# Altium PCB machdaucam96chan.PcbDoc
Units mm, origin at the board's own origin, x right, y up, seen from the top; angles counter-clockwise.
Board outline 94 x 30 mm, 2 copper layers (Top Layer, Bottom Layer); 103 components, 97 nets, 198 pads, 0 vias.
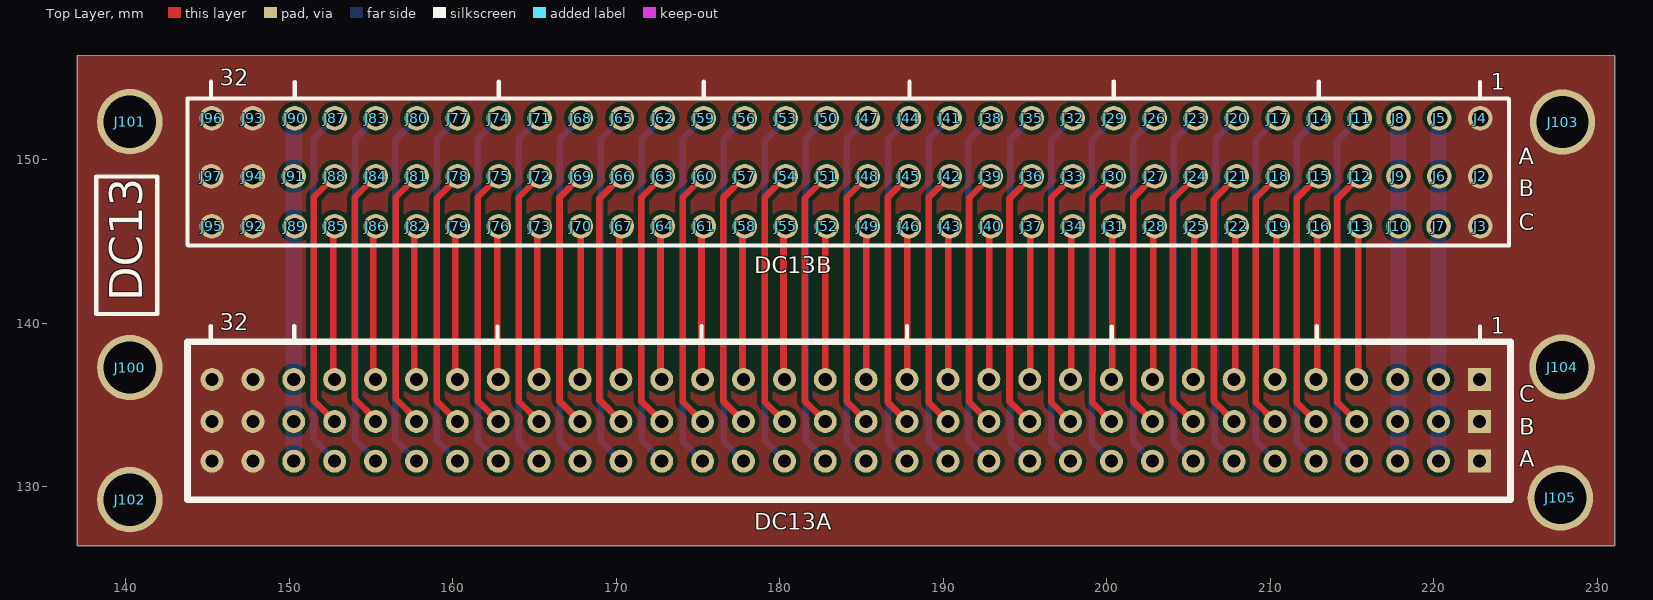
[diagram p0: Top Layer view]
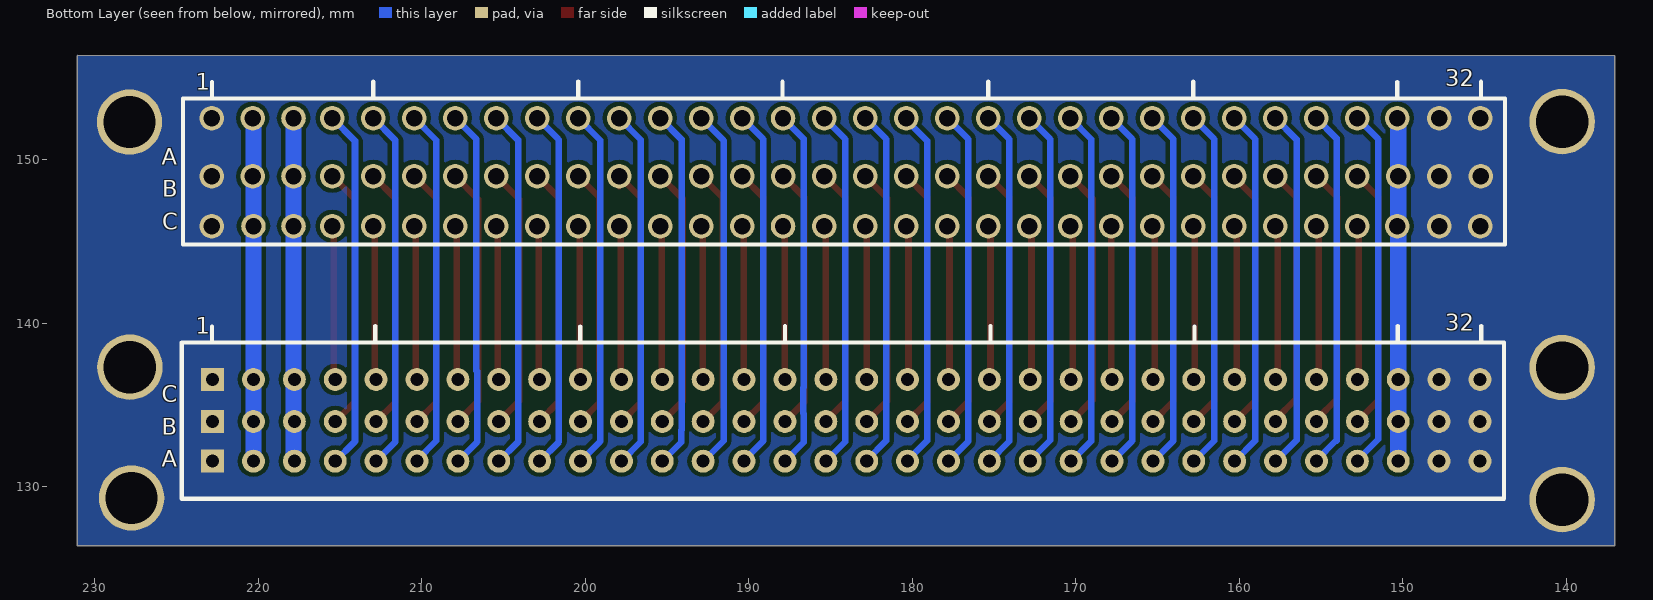
[diagram p1: Bottom Layer view, seen from below]

## Layer stack, top to bottom
Top Solder: solder mask 0.0102, Solder Resist, Dk 3.5
Top Layer: signal copper 0.0356
Dielectric1: dielectric 0.32, FR-4, Dk 4.8
Bottom Layer: signal copper 0.0356
Bottom Solder: solder mask 0.0102, Solder Resist, Dk 3.5

## Board outline
137.05,156.35 137.05,126.375 231.05,126.375 231.05,156.35 231.025,156.375

## Design rules (kind name [scope] priority, off if disabled: settings)
Clearance [All] p1: gap=0.1 ignorepadtopadclearanceinfootprint=FALSE
HoleSize [All] p1: absolutevalues=TRUE maxlimit=5 minlimit=0.025 maxpercent=80.000 minpercent=20.000
MinimumSolderMaskSliver [All] p1: minsoldermaskwidth=0.1
PolygonConnect [All] p1: connectstyle=Direct reliefconductorwidth=0.254 reliefentries=4 polygonreliefangle="90 Angle" airgapwidth=0.254
RoutingVias [All] p1: holewidth=1 width=1.5 viastyle="Through Hole" minholewidth=1 minwidth=1.5 maxholewidth=1 maxwidth=1.5
ShortCircuit [All] p1: allowed=TRUE
SilkToSilkClearance [All] p1: silktosilkclearance=0.1
SilkToSolderMaskClearance SilkscreenOverComponentPads [IsPad] p1: minsilkscreentomaskgap=0.1 clearancetoexposedcopper=TRUE
SolderMaskExpansion [All] p1: expansion=0.102
Width [All] p1: maxlimit=1 minlimit=0.254 preferedwidth=0.5
25 further rules are at their usual default settings.

## Components (designator, comment, footprint, x,y, rotation, side; value= is the part's Value field where it differs from the comment)
DC13 "GIAC 32x3 (A,B,C)" daucam96 222.783,135.56 r180 top (schematic designator J1)
J2 "header1" CON1#1 222.833,148.981 r0 top
J3 "header1" CON1#1 222.833,145.933 r0 top
J4 "header1" CON1#1 222.833,152.537 r0 top
J5 "header1" CON1#1 220.333,152.537 r0 top
J6 "header1" CON1#1 220.333,148.981 r0 top
J7 "header1" CON1#1 220.283,145.933 r0 top
J8 "header1" CON1#1 217.833,152.537 r0 top
J9 "header1" CON1#1 217.833,148.981 r0 top
J10 "header1" CON1#1 217.833,145.933 r0 top
J11 "header1" CON1#1 215.466,152.537 r0 top
J12 "header1" CON1#1 215.466,148.981 r0 top
J13 "header1" CON1#1 215.466,145.933 r0 top
J14 "header1" CON1#1 212.958,152.537 r0 top
J15 "header1" CON1#1 212.958,148.981 r0 top
J16 "header1" CON1#1 212.958,145.933 r0 top
J17 "header1" CON1#1 210.451,152.537 r0 top
J18 "header1" CON1#1 210.451,148.981 r0 top
J19 "header1" CON1#1 210.451,145.933 r0 top
J20 "header1" CON1#1 207.944,152.537 r0 top
J21 "header1" CON1#1 207.944,148.981 r0 top
J22 "header1" CON1#1 207.944,145.933 r0 top
J23 "header1" CON1#1 205.437,152.537 r0 top
J24 "header1" CON1#1 205.437,148.981 r0 top
J25 "header1" CON1#1 205.437,145.933 r0 top
J26 "header1" CON1#1 202.93,152.537 r0 top
J27 "header1" CON1#1 202.93,148.981 r0 top
J28 "header1" CON1#1 202.93,145.933 r0 top
J29 "header1" CON1#1 200.422,152.537 r0 top
J30 "header1" CON1#1 200.422,148.981 r0 top
J31 "header1" CON1#1 200.422,145.933 r0 top
J32 "header1" CON1#1 197.915,152.537 r0 top
J33 "header1" CON1#1 197.915,148.981 r0 top
J34 "header1" CON1#1 197.915,145.933 r0 top
J35 "header1" CON1#1 195.408,152.537 r0 top
J36 "header1" CON1#1 195.408,148.981 r0 top
J37 "header1" CON1#1 195.408,145.933 r0 top
J38 "header1" CON1#1 192.901,152.537 r0 top
J39 "header1" CON1#1 192.901,148.981 r0 top
J40 "header1" CON1#1 192.901,145.933 r0 top
J41 "header1" CON1#1 190.393,152.537 r0 top
J42 "header1" CON1#1 190.393,148.981 r0 top
J43 "header1" CON1#1 190.393,145.933 r0 top
J44 "header1" CON1#1 187.9,152.532 r0 top
J45 "header1" CON1#1 187.886,148.981 r0 top
J46 "header1" CON1#1 187.9,145.928 r0 top
J47 "header1" CON1#1 185.379,152.537 r0 top
J48 "header1" CON1#1 185.379,148.981 r0 top
J49 "header1" CON1#1 185.379,145.933 r0 top
J50 "header1" CON1#1 182.872,152.537 r0 top
J51 "header1" CON1#1 182.872,148.981 r0 top
J52 "header1" CON1#1 182.872,145.933 r0 top
J53 "header1" CON1#1 180.365,152.537 r0 top
J54 "header1" CON1#1 180.365,148.981 r0 top
J55 "header1" CON1#1 180.365,145.933 r0 top
J56 "header1" CON1#1 177.857,152.537 r0 top
J57 "header1" CON1#1 177.857,148.981 r0 top
J58 "header1" CON1#1 177.857,145.933 r0 top
J59 "header1" CON1#1 175.35,152.537 r0 top
J60 "header1" CON1#1 175.35,148.981 r0 top
J61 "header1" CON1#1 175.35,145.933 r0 top
J62 "header1" CON1#1 172.843,152.537 r0 top
J63 "header1" CON1#1 172.843,148.981 r0 top
J64 "header1" CON1#1 172.843,145.933 r0 top
J65 "header1" CON1#1 170.336,152.537 r0 top
J66 "header1" CON1#1 170.336,148.981 r0 top
J67 "header1" CON1#1 170.336,145.933 r0 top
J68 "header1" CON1#1 167.828,152.537 r0 top
J69 "header1" CON1#1 167.828,148.981 r0 top
J70 "header1" CON1#1 167.828,145.933 r0 top
J71 "header1" CON1#1 165.321,152.537 r0 top
J72 "header1" CON1#1 165.321,148.981 r0 top
J73 "header1" CON1#1 165.321,145.933 r0 top
J74 "header1" CON1#1 162.814,152.537 r0 top
J75 "header1" CON1#1 162.814,148.981 r0 top
J76 "header1" CON1#1 162.814,145.933 r0 top
J77 "header1" CON1#1 160.307,152.537 r0 top
J78 "header1" CON1#1 160.307,148.981 r0 top
J79 "header1" CON1#1 160.307,145.933 r0 top
J80 "header1" CON1#1 157.8,152.537 r0 top
J81 "header1" CON1#1 157.8,148.981 r0 top
J82 "header1" CON1#1 157.8,145.933 r0 top
J83 "header1" CON1#1 155.292,152.537 r0 top
J84 "header1" CON1#1 155.292,148.981 r0 top
J85 "header1" CON1#1 152.785,145.933 r0 top
J86 "header1" CON1#1 155.292,145.933 r0 top
J87 "header1" CON1#1 152.785,152.537 r0 top
J88 "header1" CON1#1 152.785,148.981 r0 top
J89 "header1" CON1#1 150.343,145.933 r0 top
J90 "header1" CON1#1 150.343,152.537 r0 top
J91 "header1" CON1#1 150.278,148.981 r0 top
J92 "header1" CON1#1 147.771,145.933 r0 top
J93 "header1" CON1#1 147.771,152.537 r0 top
J94 "header1" CON1#1 147.771,148.981 r0 top
J95 "header1" CON1#1 145.263,145.933 r0 top
J96 "header1" CON1#1 145.263,152.537 r0 top
J97 "header1" CON1#1 145.228,148.976 r0 top
J100 "header1" CON1#2 140.259,137.287 r0 top
J101 "header1" CON1#2 140.259,152.324 r0 top
J102 "header1" CON1#2 140.259,129.21 r0 top
J103 "header1" CON1#2 227.863,152.298 r0 top
J104 "header1" CON1#2 227.838,137.312 r0 top
J105 "header1" CON1#2 227.736,129.311 r0 top

## Footprints (in the part's own frame and the unit in brackets; to place one, negate y for a bottom-side part, rotate by r counter-clockwise, add the part's x,y. Pads: shape width x height; smd on the part's side, far side on the other; paste and mask are expansions set on the pad)
CON1#1 [mm]
  round 1.5 hole 1: 1(0,0)
CON1#2 [mm]
  round 4 hole 3.2: 1(0,0)
daucam96 [mm]
  rect 1.4x1.4 hole 0.8: 1(0,4) 33(0,1.575) 65(0,-1)
  round 1.4 hole 0.8: 2(2.5,4) 3(5,4) 4(7.5,4) 5(10,4) 6(12.5,4) 7(15,4) 8(17.5,4) 9(20,4) 10(22.5,4) 11(25,4) 12(27.5,4) 13(30,4) 14(32.5,4) 15(35,4) 16(37.5,4) 17(40,4) 18(42.5,4) 19(45,4) 20(47.5,4) 21(50,4) 22(52.5,4) 23(55,4) 24(57.5,4) 25(60,4) 26(62.5,4) 27(65,4) 28(67.5,4) 29(70,4) 30(72.5,4) 31(75,4) 32(77.5,4) 34(2.5,1.575) 35(5,1.575) 36(7.5,1.575) 37(10,1.575) 38(12.5,1.575) 39(15,1.575) 40(17.5,1.575) 41(20,1.575) 42(22.5,1.575) 43(25,1.575) 44(27.5,1.575) 45(30,1.575) 46(32.5,1.575) 47(35,1.575) 48(37.5,1.575) 49(40,1.575) 50(42.5,1.575) 51(45,1.575) 52(47.5,1.575) 53(50,1.575) 54(52.5,1.575) 55(55,1.575) 56(57.5,1.575) 57(60,1.575) 58(62.5,1.575) 59(65,1.575) 60(67.5,1.575) 61(70,1.575) 62(72.5,1.575) 63(75,1.575) 64(77.5,1.575) 66(2.5,-1) 67(5,-1) 68(7.5,-1) 69(10,-1) 70(12.5,-1) 71(15,-1) 72(17.5,-1) 73(20,-1) 74(22.5,-1) 75(25,-1) 76(27.5,-1) 77(30,-1) 78(32.5,-1) 79(35,-1) 80(37.5,-1) 81(40,-1) 82(42.5,-1) 83(45,-1) 84(47.5,-1) 85(50,-1) 86(52.5,-1) 87(55,-1) 88(57.5,-1) 89(60,-1) 90(62.5,-1) 91(65,-1) 92(67.5,-1) 93(70,-1) 94(72.5,-1) 95(75,-1) 96(77.5,-1)
  silkscreen extent -1.9,-3.3 79,6.35

## Nets (pads, with @x,y where several pads share a name; then routed paths per layer and width w, separated by ;. In a path a pad name is that pad's centre, name@x,y a point inside that pad or via, vN(x,y) a via of type N, cw(c..) or ccw(c..) an arc to the next point about the centre after c; other vN are vias at no path point)
GND: DC13.1 DC13.31 DC13.32 DC13.33 DC13.63 DC13.64 DC13.65 DC13.95 DC13.96 J2.1 J3.1 J4.1 J92.1 J93.1 J94.1 J95.1 J96.1 J97.1 J100.1 J101.1 J102.1 J103.1 J104.1 J105.1
NetJ1_1: 
NetJ1_2: DC13.2 DC13.34 DC13.66 J5.1 J6.1 J7.1 | length 21
  Bottom Layer w1: DC13.2 DC13.34 DC13.66 J7.1 220.283,152.487 J5.1
NetJ1_3: DC13.3 DC13.35 DC13.67 J8.1 J9.1 J10.1 | length 21
  Bottom Layer w1: DC13.3 217.833,131.61 J10.1 J9.1 J8.1
NetJ1_4: DC13.4 J11.1 | length 22.1
  Bottom Layer w0.4: DC13.4 214.074,132.77 214.074,151.145 J11.1
NetJ1_5: DC13.5 J14.1 | length 22
  Bottom Layer w0.4: DC13.5 211.599,132.745 211.599,151.177 J14.1
NetJ1_6: DC13.6 J17.1 | length 22.2
  Bottom Layer w0.4: DC13.6 210.283,131.623 209.099,132.808 209.099,151.184 J17.1 J17.1@210.3,152.537
NetJ1_7: DC13.7 J20.1 | length 22
  Bottom Layer w0.4: DC13.7 206.602,132.741 206.602,137.049 206.649,137.095 206.649,151.241 J20.1
NetJ1_8: DC13.8 J23.1 | length 22.2
  Bottom Layer w0.4: J23.1@205.275,152.537 J23.1 204.102,151.203 204.102,132.741 DC13.8
NetJ1_9: DC13.9 J26.1 | length 22
  Bottom Layer w0.4: 201.602,151.21 201.602,137.049 201.602,132.741 DC13.9 ; 201.647,151.254 J26.1
NetJ1_10: DC13.10 J29.1 | length 22
  Bottom Layer w0.4: DC13.10 199.074,132.77 199.074,151.188 J29.1
NetJ1_11: DC13.11 J32.1 | length 22
  Bottom Layer w0.4: DC13.11 196.599,132.745 196.599,151.22 J32.1
NetJ1_12: DC13.12 J35.1 | length 22
  Bottom Layer w0.4: DC13.12 194.125,132.718 194.125,133.45 194.102,133.473 194.102,151.231 J35.1
NetJ1_13: DC13.13 J38.1 | length 22.1
  Bottom Layer w0.4: DC13.13 191.532,132.812 191.532,151.168 J38.1
NetJ1_14: DC13.14 J41.1 | length 22
  Bottom Layer w0.4: DC13.14 190.283,131.623 189.102,132.804 189.102,137.049 189.111,137.057 189.111,151.254 J41.1
NetJ1_15: DC13.15 J44.1 | length 22.1
  Bottom Layer w0.4: J44.1@187.772,152.532 J44.1 186.629,151.261 186.629,136.082 186.665,136.047 186.665,134.498 186.629,134.463 186.629,132.714 DC13.15
NetJ1_16: DC13.16 J47.1 | length 22.5
  Bottom Layer w0.4: DC13.16 184.096,132.747 184.096,151.254 J47.1 J47.1@185.379,152.082
NetJ1_17: DC13.17 J50.1 | length 22
  Bottom Layer w0.4: DC13.17 182.783,131.623 181.589,132.817 181.589,151.254 J50.1
NetJ1_18: DC13.18 J53.1 | length 22.4
  Bottom Layer w0.4: DC13.18 180.283,131.623 179.082,132.824 179.082,151.144 180.365,152.426 J53.1 J53.1@180.365,152.094
NetJ1_19: DC13.19 J56.1 | length 22
  Bottom Layer w0.4: DC13.19 176.575,132.769 176.575,151.254 J56.1
NetJ1_20: DC13.20 J59.1 | length 22.5
  Bottom Layer w0.4: DC13.20 174.068,132.776 174.068,151.254 J59.1 J59.1@175.35,152.032
NetJ1_21: DC13.21 J62.1 | length 22
  Bottom Layer w0.4: DC13.21 172.783,131.623 171.56,132.846 171.56,151.254 J62.1
NetJ1_22: DC13.22 J65.1 | length 22
  Bottom Layer w0.4: DC13.22 169.049,132.795 169.049,151.25 J65.1
NetJ1_23: DC13.23 J68.1 | length 22
  Bottom Layer w0.4: DC13.23 166.546,132.797 166.546,151.254 J68.1
NetJ1_24: DC13.24 J71.1 | length 22.5
  Bottom Layer w0.4: DC13.24 164.032,132.812 164.032,151.247 J71.1 J71.1@165.321,152.039
NetJ1_25: DC13.25 J74.1 | length 22
  Bottom Layer w0.4: DC13.25 161.531,132.812 161.531,151.254 J74.1
NetJ1_26: DC13.26 J77.1 | length 22
  Bottom Layer w0.4: DC13.26 159.024,132.819 159.024,151.254 J77.1
NetJ1_27: DC13.27 J80.1 | length 22
  Bottom Layer w0.4: DC13.27 156.499,132.845 156.499,151.236 J80.1
NetJ1_28: DC13.28 J83.1 | length 23.2
  Bottom Layer w0.4: 154.05,132.798 154.05,145.974 ; 154.05,144.813 154.05,151.295 J83.1 J83.1@155.292,152.479 ; 154.102,132.804 155.283,131.623 DC13.28
NetJ1_29: DC13.29 J87.1 | length 22.6
  Bottom Layer w0.4: DC13.29 152.783,131.623 151.503,132.904 151.503,151.254 J87.1 J87.1@152.785,152.023
NetJ1_30: DC13.30 DC13.62 DC13.94 J89.1 J90.1 J91.1 | length 21
  Bottom Layer w1: DC13.30 DC13.62 DC13.94 150.283,152.477 J90.1
NetJ1_31: 
NetJ1_32: 
NetJ1_33: 
NetJ1_34: 
NetJ1_35: 
NetJ1_36: DC13.36 J12.1 | length 16.1
  Top Layer w0.4: DC13.36 214.102,135.166 214.102,147.618 J12.1
NetJ1_37: DC13.37 J15.1 | length 16.7
  Top Layer w0.4: J15.1@212.608,148.63 212.608,148.981 J15.1 211.602,147.625 211.602,135.166 DC13.37
NetJ1_38: DC13.38 J18.1 | length 16.1
  Top Layer w0.4: DC13.38 209.102,135.166 209.102,147.632 J18.1 J18.1@210.434,148.981
NetJ1_39: DC13.39 J21.1 | length 16.1
  Top Layer w0.4: DC13.39 206.532,135.237 206.532,147.568 J21.1
NetJ1_40: DC13.40 J24.1 | length 16.1
  Top Layer w0.4: DC13.40 204.032,135.237 204.032,147.576 J24.1
NetJ1_41: DC13.41 J27.1 | length 16.2
  Top Layer w0.4: J27.1@202.753,148.981 J27.1 201.602,147.654 201.602,135.212 202.783,134.031 DC13.41
NetJ1_42: DC13.42 J30.1 | length 16.4
  Top Layer w0.4: DC13.42 199.102,135.166 199.102,137.049 199.14,137.086 199.14,147.698 J30.1 J30.1@200.422,148.602
NetJ1_43: DC13.43 J33.1 | length 16.9
  Top Layer w0.4: DC13.43@197.678,133.88 DC13.43@197.851,133.708 ; DC13.43 196.602,135.166 196.602,147.668 J33.1 J33.1@197.915,148.387
NetJ1_44: DC13.44 J36.1 | length 16.1
  Top Layer w0.4: DC13.44 194.049,135.22 194.049,147.622 J36.1
NetJ1_45: DC13.45 J39.1 | length 16.5
  Top Layer w0.4: DC13.45 191.582,135.186 191.582,147.663 J39.1 J39.1@192.901,148.537
NetJ1_46: DC13.46 J42.1 | length 16.4
  Top Layer w0.4: DC13.46 189.102,135.166 189.102,147.69 J42.1 J42.1@190.393,148.603
NetJ1_47: DC13.47 J45.1 | length 16
  Top Layer w0.4: DC13.47 186.614,135.154 186.614,147.708 J45.1
NetJ1_48: DC13.48 J48.1 | length 16
  Top Layer w0.4: DC13.48 185.283,134.025 184.096,135.212 184.096,147.698 J48.1
NetJ1_49: DC13.49 J51.1 | length 16.4
  Top Layer w0.4: DC13.49 181.532,135.237 181.532,147.641 J51.1 J51.1@182.872,148.609
NetJ1_50: DC13.50 J54.1 | length 16
  Top Layer w0.4: DC13.50 179.074,135.195 179.074,147.69 J54.1
NetJ1_51: DC13.51 J57.1 | length 16.1
  Top Layer w0.4: DC13.51 176.532,135.237 176.532,147.655 J57.1
NetJ1_52: DC13.52 J60.1 | length 16
  Top Layer w0.4: DC13.52 174.068,135.201 174.068,147.698 J60.1
NetJ1_53: DC13.53 J63.1 | length 16.1
  Top Layer w0.4: DC13.53 171.532,135.237 171.532,147.67 J63.1
NetJ1_54: DC13.54 J66.1 | length 16.5
  Top Layer w0.4: DC13.54 168.974,135.295 168.974,147.619 J66.1 J66.1@170.336,148.606
NetJ1_55: DC13.55 J69.1 | length 16.1
  Top Layer w0.4: DC13.55 166.532,135.237 166.532,147.684 J69.1
NetJ1_56: DC13.56 J72.1 | length 16
  Top Layer w0.4: DC13.56 164.039,135.23 164.039,147.698 J72.1
NetJ1_57: DC13.57 J75.1 | length 16
  Top Layer w0.4: DC13.57 161.531,135.237 161.531,147.698 J75.1
NetJ1_58: DC13.58 J78.1 | length 16.8
  Top Layer w0.4: DC13.58 159.024,135.245 159.024,147.619 J78.1@160.477,149.073 ; J78.1@160.307,148.425 J78.1
NetJ1_59: DC13.59 J81.1 | length 16.1
  Top Layer w0.4: DC13.59 157.783,134.112 156.517,135.379 156.517,147.698 J81.1 J81.1@157.795,148.981
NetJ1_60: DC13.60 J84.1 | length 16.4
  Top Layer w0.4: DC13.60 155.283,134.105 154.01,135.379 154.01,147.698 J84.1 J84.1@155.292,148.663
NetJ1_61: DC13.61 J88.1 | length 16.2
  Top Layer w0.4: DC13.61 151.503,135.266 151.503,147.698 J88.1 J88.1@152.785,148.797
NetJ1_62: 
NetJ1_63: 
NetJ1_64: 
NetJ1_65: 
NetJ1_66: 
NetJ1_67: 
NetJ1_68: DC13.68 J13.1 | length 9.4
  Top Layer w0.4: DC13.68@215.351,136.56 215.364,136.573 J13.1@215.364,145.933
NetJ1_69: DC13.69 J16.1 | length 9.3
  Top Layer w0.4: DC13.69@212.857,136.601 J16.1@212.857,145.933
NetJ1_70: DC13.70 J19.1 | length 9.4
  Top Layer w0.4: DC13.70@210.35,136.561 J19.1@210.35,145.933
NetJ1_71: DC13.71 J22.1 | length 9.4
  Top Layer w0.4: J22.1@207.842,145.933 207.842,136.568 DC13.71@207.85,136.56
NetJ1_72: DC13.72 J25.1 | length 9.1
  Top Layer w0.4: J25.1@205.335,145.933 205.335,136.896 DC13.72@205.351,136.881
NetJ1_73: DC13.73 J28.1 | length 9.4
  Top Layer w0.4: DC13.73@202.828,136.56 J28.1@202.828,145.933
NetJ1_74: DC13.74 J31.1 | length 9.4
  Top Layer w0.4: DC13.74@200.321,136.56 J31.1@200.321,145.933
NetJ1_75: DC13.75 J34.1 | length 9.7
  Top Layer w0.4: J34.1@197.814,146.101 197.814,136.46 DC13.75@197.851,136.423
NetJ1_76: DC13.76 J37.1 | length 9.4
  Top Layer w0.4: DC13.76@195.306,136.56 J37.1@195.306,145.933
NetJ1_77: DC13.77 J40.1 | length 9.4
  Top Layer w0.4: DC13.77@192.799,136.56 J40.1@192.799,145.933
NetJ1_78: DC13.78 J43.1 | length 9.4
  Top Layer w0.4: J43.1@190.292,145.933 190.292,136.655 DC13.78@190.351,136.596
NetJ1_79: DC13.79 J46.1 | length 9.4
  Top Layer w0.4: DC13.79@187.799,136.56 J46.1@187.799,145.928
NetJ1_80: DC13.80 J49.1 | length 9.4
  Top Layer w0.4: J49.1@185.277,145.933 185.277,136.633 DC13.80@185.351,136.56
NetJ1_81: DC13.81 J52.1 | length 9.4
  Top Layer w0.4: DC13.81@182.77,136.56 J52.1@182.77,145.933
NetJ1_82: DC13.82 J55.1 | length 9.4
  Top Layer w0.4: DC13.82@180.228,136.56 J55.1@180.228,145.933
NetJ1_83: DC13.83 J58.1 | length 10.1
  Top Layer w0.4: DC13.83@177.72,136.56 177.72,144.511 ; J58.1@177.72,145.933 J58.1@177.72,145.263 ; 177.72,144.511 J58.1@177.72,145.263 ; 177.72,144.511 177.72,144.709 J58.1@177.72,145.263
NetJ1_84: DC13.84 J61.1 | length 10.1
  Top Layer w0.4: DC13.84@175.213,136.56 175.213,144.536 ; J61.1@175.213,145.933 J61.1@175.213,145.288 ; 175.213,144.536 J61.1@175.213,145.288 ; 175.213,144.536 175.213,144.709 J61.1@175.213,145.288
NetJ1_85: DC13.85 J64.1 | length 9.4
  Top Layer w0.4: DC13.85@172.706,136.56 J64.1@172.706,145.933
NetJ1_86: DC13.86 J67.1 | length 10.1
  Top Layer w0.4: DC13.86@170.199,136.56 170.199,144.236 ; J67.1@170.199,145.933 170.199,144.988 ; 170.199,144.236 170.199,144.988 ; 170.199,144.236 170.199,144.709 170.199,144.988
NetJ1_87: DC13.87 J70.1 | length 9.4
  Top Layer w0.4: DC13.87@167.828,136.56 J70.1
NetJ1_88: DC13.88 J73.1 | length 10.3
  Top Layer w0.4: DC13.88@165.184,136.56 J73.1@165.184,145.288 ; 165.184,144.709 165.184,144.536 J73.1@165.184,145.898 ; J73.1@165.286,145.898 J73.1
NetJ1_89: DC13.89 J76.1 | length 9.6
  Top Layer w0.4: J76.1@162.712,145.933 162.712,136.631 DC13.89 ; J76.1 J76.1@162.952,145.795
NetJ1_90: DC13.90 J79.1 | length 9.4
  Top Layer w0.4: DC13.90@160.17,136.56 J79.1@160.17,145.898 ; J79.1@160.271,145.898 J79.1
NetJ1_91: DC13.91 J82.1 | length 9.4
  Top Layer w0.4: DC13.91@157.663,136.56 J82.1@157.663,145.933 ; J82.1@157.764,145.898 J82.1
NetJ1_92: DC13.92 J86.1 | length 9.4
  Top Layer w0.4: DC13.92@155.155,136.56 J86.1@155.155,145.933 ; J86.1@155.257,145.898 J86.1
NetJ1_93: DC13.93 J85.1 | length 9.5
  Top Layer w0.4: J85.1@152.684,145.933 152.684,136.66 DC13.93 ; J85.1@152.75,145.898 J85.1
NetJ1_94: 
NetJ1_95: 
NetJ1_96: 

## Polygon pours and split planes (outlines as drawn)
GND on Top Layer "Top Layer-No Net" (solid, remove dead copper, pour order 4): 137.05,156.35 137.05,126.375 231.05,126.375 231.05,156.35 231.025,156.375
GND on Bottom Layer "Top Layer-No Net1" (solid, remove dead copper, pour order 5): 137.05,156.35 137.05,126.375 231.05,126.375 231.05,156.35 231.025,156.375

## Silkscreen, mask and mechanical layers (free items; w line width, h text height)
Top Overlay:
  lines w0.254: 143.783,144.805 143.783,153.746 224.536,153.746 224.587,153.695 224.587,144.755 143.834,144.755 ; 145.203,138.836 145.203,139.827 ; 145.228,153.772 145.228,154.762 ; 150.309,138.836 150.309,139.827 ; 150.343,153.759 150.343,154.749 ; 162.738,138.811 162.738,139.802 ; 162.814,153.772 162.814,154.762 ; 175.209,138.836 175.209,139.827 ; 175.35,153.772 175.35,154.762 ; 187.782,138.836 187.782,139.827 ; 187.926,153.772 187.926,154.762 ; 200.304,138.811 200.304,139.802 ; 200.422,153.784 200.422,154.775 ; 212.834,138.836 212.834,139.827 ; 212.954,153.772 212.954,154.762 ; 222.809,138.811 222.809,139.802 ; 222.809,153.746 222.809,154.737 ; 138.201,140.564 138.201,148.971 141.935,148.971 141.935,140.564 138.201,140.564
  text "32" at 145.771,154.508 h1
  text "1" at 223.469,154.28 h1
  text "A" at 225.196,149.708 h1
  text "B" at 225.196,147.752 h1
  text "C" at 225.196,145.694 h1
  text "DC13B" at 178.435,143.053 h1
  text "32" at 145.745,139.573 h1
  text "1" at 223.469,139.344 h1
  text "C" at 225.222,135.153 h1
  text "B" at 225.222,133.185 h1
  text "A" at 225.222,131.216 h1
  text "DC13A" at 178.435,127.381 h1
Bottom Overlay:
  lines w0.254: 145.203,138.836 145.203,139.827 ; 145.228,153.772 145.228,154.762 ; 150.309,138.836 150.309,139.827 ; 150.343,153.759 150.343,154.749 ; 162.738,138.811 162.738,139.802 ; 162.814,153.772 162.814,154.762 ; 175.209,138.836 175.209,139.827 ; 175.35,153.772 175.35,154.762 ; 187.782,138.836 187.782,139.827 ; 187.926,153.772 187.926,154.762 ; 200.304,138.811 200.304,139.802 ; 200.422,153.784 200.422,154.775 ; 212.834,138.836 212.834,139.827 ; 212.954,153.772 212.954,154.762 ; 222.809,138.811 222.809,139.802 ; 222.809,153.746 222.809,154.737 ; 143.764,144.805 224.587,144.805 224.587,153.746 143.764,153.746 143.764,144.805 ; 143.815,129.261 143.815,138.811 224.663,138.811 224.663,129.261 143.815,129.261
  text "32" at 147.422,154.483 h1
  text "1" at 223.825,154.28 h1
  text "A" at 225.882,149.682 h1
  text "B" at 225.857,147.739 h1
  text "C" at 225.857,145.72 h1
  text "32" at 147.396,139.548 h1
  text "1" at 223.825,139.344 h1
  text "C" at 225.882,135.153 h1
  text "B" at 225.882,133.185 h1
  text "A" at 225.882,131.216 h1
Mechanical 1:
  drawing of 312 lines, arcs and shapes, not listed